# Altium PCB Zotino-DIOT.PCBDOC (part 9 of 11)
Units mil, origin at the board's own origin, x right, y up, seen from the top; angles counter-clockwise.
Board outline 8771.61 x 3949.04 mil, 4 copper layers (TopLayer, Internal Plane 2, Signal Layer 1, BottomLayer), stack 61.54 mil thick; 915 components, 534 nets, 3073 pads, 1180 vias.
Unrouted connection lines stored in the file: 36.
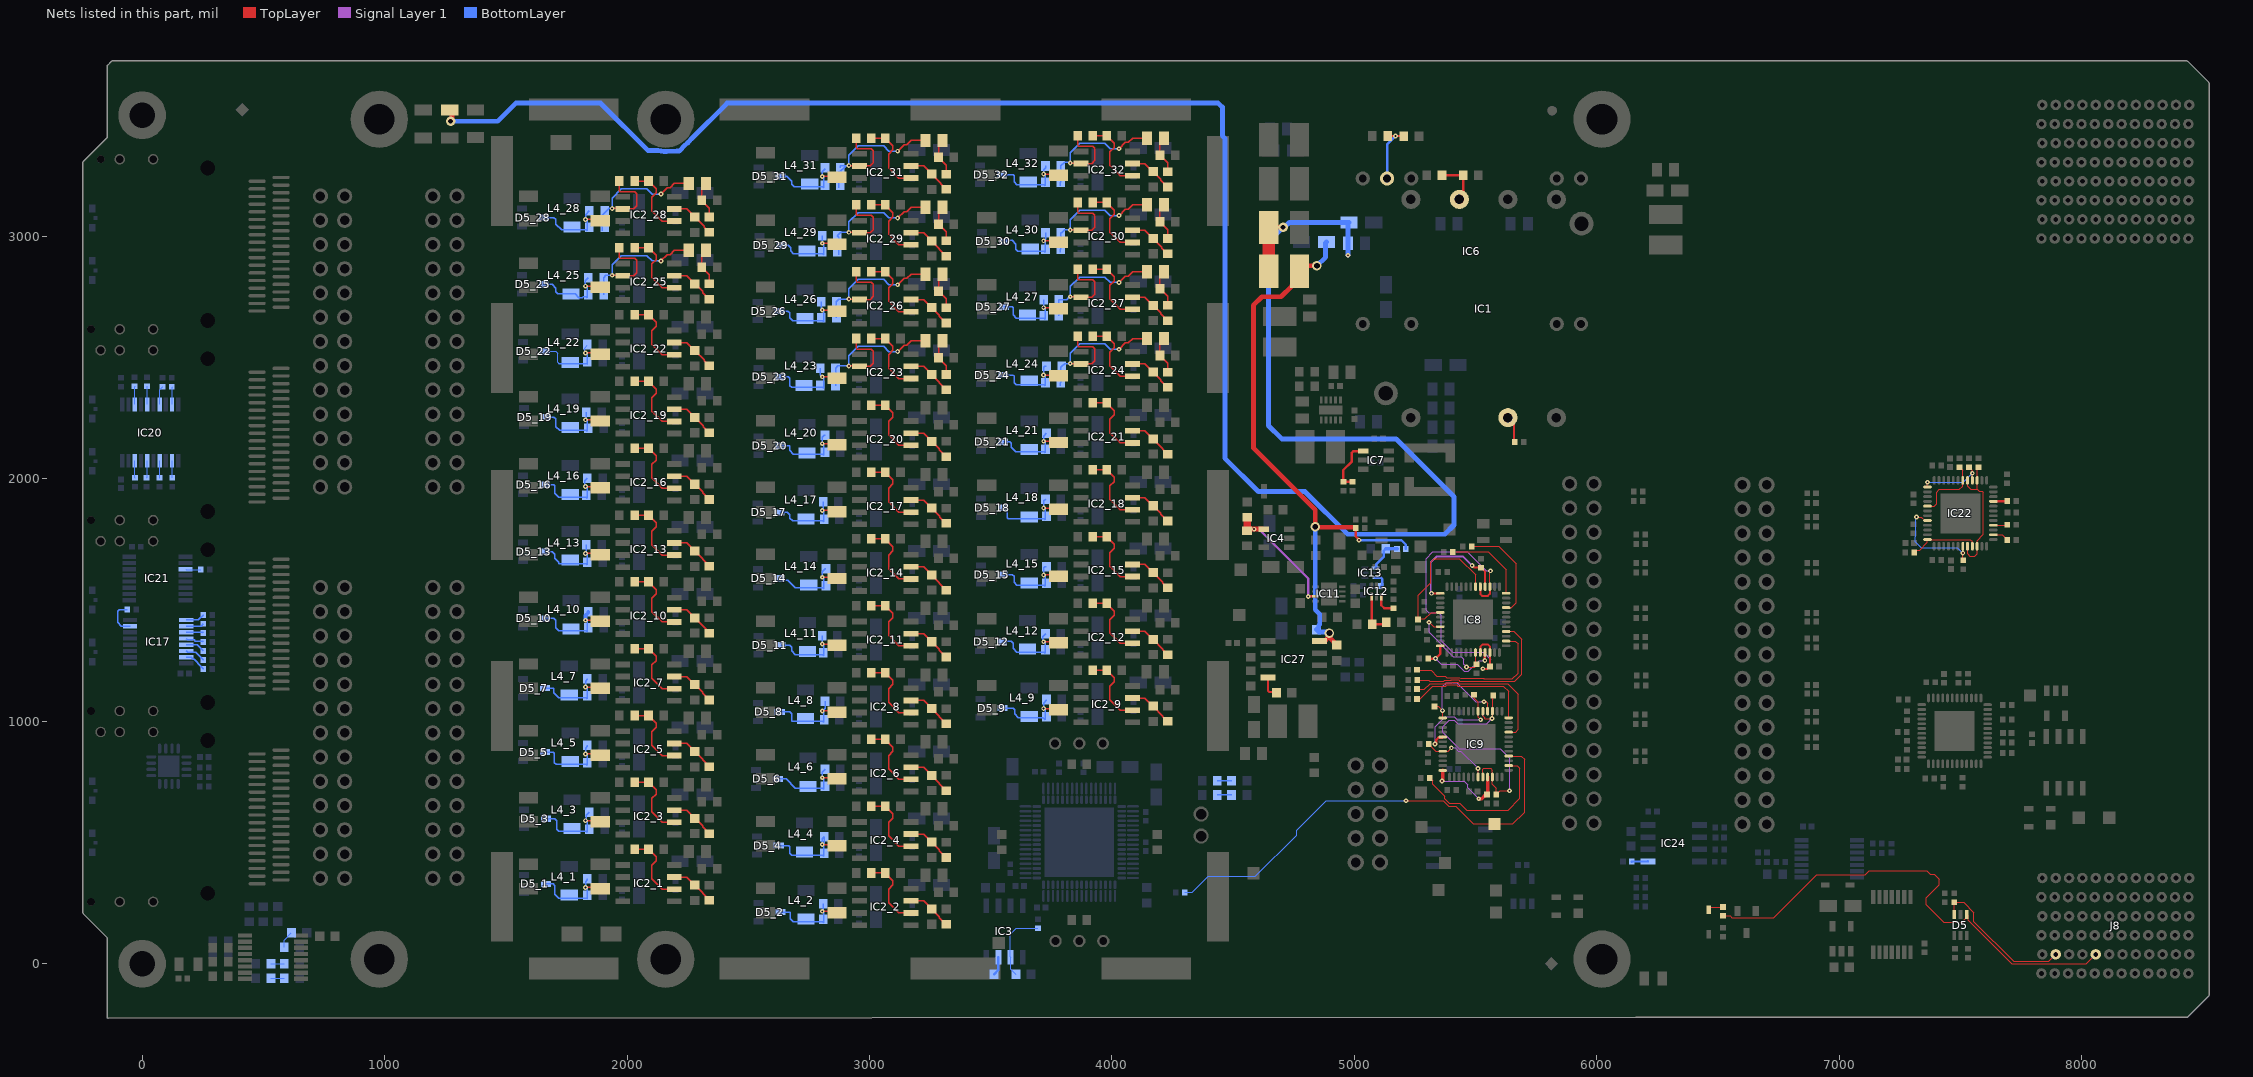
[diagram p10: the nets of this part, all layers, seen from the top]

## Via types
v1: diameter 19.68, hole 7.87, TopLayer to BottomLayer, tented both sides, 1050 vias
v2: diameter 23.62, hole 11.81, TopLayer to BottomLayer, tented both sides, 56 vias
v3: diameter 23.62, hole 11.81, TopLayer to BottomLayer, 28 vias
v4: diameter 39.37, hole 23.62, TopLayer to BottomLayer, tented both sides, 28 vias
v5: diameter 39.37, hole 19.68, TopLayer to BottomLayer, tented both sides, 7 vias
v6: diameter 19.68, hole 7.87, TopLayer to BottomLayer, tented bottom, 7 vias
v7: diameter 19.68, hole 7.87, TopLayer to BottomLayer, 4 vias

## Nets (pads, with @x,y where several pads share a name; then routed paths per layer and width w, separated by ;. In a path a pad name is that pad's centre, name@x,y a point inside that pad or via, vN(x,y) a via of type N, cw(c..) or ccw(c..) an arc to the next point about the centre after c; other vN are vias at no path point) (continued)
NetC56_23_1: C56_23.1 R24_23.2 R25_23.1 | length 158.6
  TopLayer w6: C56_23.1@3301.81,2569.3 3284.88,2552.37 R24_23.2@3284.88,2499.3 3316.38,2467.8 R25_23.1@3316.38,2430.8
NetC56_23_2: C56_23.2 IC2_23.6 R5_23.1 R7_23.1 R67_23.2 | length 807
  TopLayer w6: v1(2914.94,2466.1) 2956.88,2466.1 IC2_23.6@2958.68,2464.3 3003.79,2464.3 3016.57,2477.09 3016.57,2527.37 3008,2535.94 2948,2535.94 2944.88,2539.06 R67_23.2@2944.88,2579.3 ; v1(3116.38,2525.32) 3142.67,2551.61 3153.93,2551.61 3171.61,2569.3 C56_23.2@3230.94,2569.3
  BottomLayer w6: R7_23.1@2860,2385.36 R5_23.1@2860,2456.23 2869.88,2466.1 v1(2914.94,2466.1) 2914.94,2509.12 2953.39,2547.57 3058,2547.57 3080.25,2525.32 v1(3116.38,2525.32)
NetC56_24_1: C56_24.1 R24_24.2 R25_24.1 | length 158.6
  TopLayer w6: C56_24.1@4215.2,2579.14 4198.27,2562.21 R24_24.2@4198.27,2509.14 4229.76,2477.64 R25_24.1@4229.76,2440.64
NetC56_24_2: C56_24.2 IC2_24.6 R5_24.1 R7_24.1 R67_24.2 | length 799.4
  TopLayer w6: v1(3828.33,2475.95) 3870.26,2475.95 IC2_24.6@3872.07,2474.14 3917.17,2474.14 3929.96,2486.93 3929.96,2537.21 3921.39,2545.79 3861.39,2545.79 3858.27,2548.91 R67_24.2@3858.27,2589.14 ; v1(4029.76,2535.16) 4056.06,2561.46 4067.31,2561.46 4085,2579.14 C56_24.2@4144.33,2579.14
  BottomLayer w6: R7_24.1@3787.66,2383.64 R7_24.1@3787.66,2397.17 ; R7_24.1@3789.13,2397.17 3789.13,2460.17 R5_24.1@3793.07,2464.1 3804.91,2475.95 v1(3828.33,2475.95) 3828.33,2518.97 3866.77,2557.41 3971.39,2557.41 3993.63,2535.16 v1(4029.76,2535.16)
NetC56_25_1: C56_25.1 R24_25.2 R25_25.1 | length 158.6
  TopLayer w6: C56_25.1@2325.43,2943.31 2308.5,2926.39 R24_25.2@2308.5,2873.32 2340,2841.82 R25_25.1@2340,2804.81
NetC56_25_2: C56_25.2 IC2_25.6 R5_25.1 R7_25.1 R67_25.2 | length 787.3
  TopLayer w6: v1(1938.56,2840.12) 1980.5,2840.12 IC2_25.6@1982.31,2838.32 2027.41,2838.32 2040.2,2851.1 2040.2,2901.39 2031.62,2909.96 1971.62,2909.96 1968.5,2913.08 R67_25.2@1968.5,2953.32 ; v1(2140,2899.33) 2166.3,2925.63 2177.55,2925.63 2195.23,2943.32 C56_25.2@2254.57,2943.31
  BottomLayer w6: R7_25.1@1903.31,2759.38 R5_25.1@1903.31,2830.24 1913.18,2840.12 v1(1938.56,2840.12) 1938.56,2883.14 1977.01,2921.58 2081.62,2921.58 2103.87,2899.33 v1(2140,2899.33)
NetC56_26_1: C56_26.1 R24_26.2 R25_26.1 | length 158.6
  TopLayer w6: C56_26.1@3301.81,2844.89 3284.88,2827.96 R24_26.2@3284.88,2774.89 3316.38,2743.39 R25_26.1@3316.38,2706.39
NetC56_26_2: C56_26.2 IC2_26.6 R5_26.1 R7_26.1 R67_26.2 | length 799.1
  TopLayer w6: v1(2914.94,2741.69) 2956.88,2741.69 IC2_26.6@2958.68,2739.89 3003.79,2739.89 3016.57,2752.68 3016.57,2802.96 3008,2811.53 2948,2811.53 2944.88,2814.65 R67_26.2@2944.88,2854.89 ; v1(3116.38,2800.91) 3142.67,2827.2 3153.93,2827.2 3171.61,2844.89 C56_26.2@3230.94,2844.89
  BottomLayer w6: R7_26.1@2863.94,2664.89 R5_26.1@2863.94,2731.82 2873.81,2741.69 v1(2914.94,2741.69) 2914.94,2784.71 2953.39,2823.16 3058,2823.16 3080.25,2800.91 v1(3116.38,2800.91)
NetC56_27_1: C56_27.1 R24_27.2 R25_27.1 | length 158.6
  TopLayer w6: C56_27.1@4215.2,2854.73 4198.27,2837.8 R24_27.2@4198.27,2784.73 4229.76,2753.24 R25_27.1@4229.76,2716.23
NetC56_27_2: C56_27.2 IC2_27.6 R5_27.1 R7_27.1 R67_27.2 | length 796
  TopLayer w6: v1(3828.33,2751.54) 3870.26,2751.54 IC2_27.6@3872.07,2749.73 3917.17,2749.73 3929.96,2762.52 3929.96,2812.8 3921.39,2821.38 3861.39,2821.38 3858.27,2824.5 R67_27.2@3858.27,2864.73 ; v1(4029.76,2810.75) 4056.06,2837.05 4067.31,2837.05 4085,2854.73 C56_27.2@4144.33,2854.73
  BottomLayer w6: R7_27.1@3781.26,2672.76 R5_27.1@3781.26,2739.69 3812.76,2739.69 3824.6,2751.54 v1(3828.33,2751.54) 3828.33,2794.56 3866.77,2833 3971.39,2833 3993.63,2810.75 v1(4029.76,2810.75)
NetC56_28_1: C56_28.1 R24_28.2 R25_28.1 | length 158.6
  TopLayer w6: C56_28.1@2325.43,3218.9 2308.5,3201.98 R24_28.2@2308.5,3148.91 2340,3117.41 R25_28.1@2340,3080.4
NetC56_28_2: C56_28.2 IC2_28.6 R5_28.1 R7_28.1 R67_28.2 | length 793.2
  TopLayer w6: v1(1938.56,3115.71) 1980.5,3115.71 IC2_28.6@1982.31,3113.91 2027.41,3113.91 2040.2,3126.69 2040.2,3176.98 2031.62,3185.55 1971.62,3185.55 1968.5,3188.67 R67_28.2@1968.5,3228.91 ; v1(2140,3174.92) 2166.3,3201.22 2177.55,3201.22 2195.23,3218.91 C56_28.2@2254.57,3218.9
  BottomLayer w6: R7_28.1@1897.9,3023.4 1897.9,3086.8 1926.81,3115.71 v1(1938.56,3115.71) 1938.56,3158.73 1977.01,3197.17 2081.62,3197.17 2103.87,3174.92 v1(2140,3174.92)
NetC56_29_1: C56_29.1 R24_29.2 R25_29.1 | length 158.6
  TopLayer w6: C56_29.1@3301.81,3120.48 3284.88,3103.55 R24_29.2@3284.88,3050.48 3316.38,3018.98 R25_29.1@3316.38,2981.98
NetC56_29_2: C56_29.2 IC2_29.6 R5_29.1 R7_29.1 R67_29.2 | length 811
  TopLayer w6: v1(2914.94,3017.29) 2956.88,3017.29 IC2_29.6@2958.68,3015.48 3003.79,3015.48 3016.57,3028.27 3016.57,3078.55 3008,3087.13 2948,3087.13 2944.88,3090.24 R67_29.2@2944.88,3130.48 ; v1(3116.38,3076.5) 3142.67,3102.8 3153.93,3102.8 3171.61,3120.48 C56_29.2@3230.94,3120.48
  BottomLayer w6: R7_29.1@2874.27,2924.98 2874.27,2997.07 R5_29.1@2867.87,3003.47 2881.69,3017.29 v1(2914.94,3017.29) 2914.94,3060.3 2953.39,3098.75 3058,3098.75 3080.25,3076.5 v1(3116.38,3076.5)
NetC56_30_1: C56_30.1 R24_30.2 R25_30.1 | length 158.6
  TopLayer w6: C56_30.1@4215.2,3130.32 4198.27,3113.39 R24_30.2@4198.27,3060.32 4229.76,3028.83 R25_30.1@4229.76,2991.82
NetC56_30_2: C56_30.2 IC2_30.6 R5_30.1 R7_30.1 R67_30.2 | length 801.7
  TopLayer w6: v1(3828.33,3027.13) 3870.26,3027.13 IC2_30.6@3872.07,3025.32 3917.17,3025.32 3929.96,3038.11 3929.96,3088.39 3921.39,3096.97 3861.39,3096.97 3858.27,3100.09 R67_30.2@3858.27,3140.32 ; v1(4029.76,3086.34) 4056.06,3112.64 4067.31,3112.64 4085,3130.32 C56_30.2@4144.33,3130.32
  BottomLayer w6: R7_30.1@3787.66,2934.82 R7_30.1@3787.66,2948.35 ; R7_30.1@3789.13,2948.35 R5_30.1@3789.13,3015.28 3793.07,3015.28 3804.91,3027.13 v1(3828.33,3027.13) 3828.33,3070.15 3866.77,3108.59 3971.39,3108.59 3993.63,3086.34 v1(4029.76,3086.34)
NetC56_31_1: C56_31.1 R24_31.2 R25_31.1 | length 158.6
  TopLayer w6: C56_31.1@3301.81,3396.07 3284.88,3379.14 R24_31.2@3284.88,3326.07 3316.38,3294.57 R25_31.1@3316.38,3257.57
NetC56_31_2: C56_31.2 IC2_31.6 R5_31.1 R7_31.1 R67_31.2 | length 825.4
  TopLayer w6: v1(2914.94,3292.88) 2956.88,3292.88 IC2_31.6@2958.68,3291.07 3003.79,3291.07 3016.57,3303.86 3016.57,3354.14 3008,3362.72 2948,3362.72 2944.88,3365.83 R67_31.2@2944.88,3406.07 ; v1(3116.38,3352.09) 3142.67,3378.39 3153.93,3378.39 3171.61,3396.07 C56_31.2@3230.94,3396.07
  BottomLayer w6: R7_31.1@2874.27,3200.57 2874.27,3263.97 2903.18,3292.88 ; R5_31.1@2879.69,3283 2879.69,3290.87 2881.69,3292.88 2903.18,3292.88 ; v1(3116.38,3352.09) 3080.25,3352.09 3058,3374.34 2953.39,3374.34 2914.94,3335.9 v1(2914.94,3292.88) 2903.18,3292.88
NetC56_32_1: C56_32.1 R24_32.2 R25_32.1 | length 158.6
  TopLayer w6: C56_32.1@4215.2,3405.91 4198.27,3388.98 R24_32.2@4198.27,3335.91 4229.76,3304.42 R25_32.1@4229.76,3267.41
NetC56_32_2: C56_32.2 IC2_32.6 R5_32.1 R7_32.1 R67_32.2 | length 801.2
  TopLayer w6: v1(3828.33,3302.72) 3870.26,3302.72 IC2_32.6@3872.07,3300.91 3917.17,3300.91 3929.96,3313.7 3929.96,3363.98 3921.39,3372.56 3861.39,3372.56 3858.27,3375.68 R67_32.2@3858.27,3415.91 ; v1(4029.76,3361.93) 4056.06,3388.23 4067.31,3388.23 4085,3405.91 C56_32.2@4144.33,3405.91
  BottomLayer w6: R7_32.1@3787.66,3210.41 R7_32.1@3787.66,3223.94 ; R7_32.1@3789.13,3223.94 R5_32.1@3789.13,3290.87 3804.88,3306.62 3820.7,3306.62 v1@3824.6,3302.72 ; v1(3828.33,3302.72) 3828.33,3345.74 3866.77,3384.18 3971.39,3384.18 3993.63,3361.93 v1(4029.76,3361.93)
NetC61_1_2: C61_1.2 IC2_1.3 R25_1.2 | length 186.8
  TopLayer w6: IC2_1.3@2194.9,358 2246.5,358 C61_1.2@2280,324.5 2311.5,293 2311.5,290.01 R25_1.2@2340,261.5
NetC61_2_2: C61_2.2 IC2_2.3 R25_2.2 | length 187.9
  TopLayer w6: IC2_2.3@3171.28,259.57 3222.87,259.57 3287.87,194.57 3287.87,189.77 3314.57,163.08 R25_2.2@3316.38,163.08
NetC61_3_2: C61_3.2 IC2_3.3 R25_3.2 | length 186.8
  TopLayer w6: IC2_3.3@2194.9,633.59 2246.5,633.59 2311.5,568.59 2311.5,565.6 R25_3.2@2340,537.09
NetC61_4_2: C61_4.2 IC2_4.3 R25_4.2 | length 186.8
  TopLayer w6: IC2_4.3@3171.28,535.17 3222.87,535.17 3287.87,470.17 3287.87,467.17 R25_4.2@3316.38,438.67
NetC61_5_2: C61_5.2 IC2_5.3 R25_5.2 | length 186.8
  TopLayer w6: IC2_5.3@2194.9,909.18 2246.5,909.18 C61_5.2@2280,875.68 2311.5,844.18 2311.5,841.19 R25_5.2@2340,812.68
NetC61_6_2: C61_6.2 IC2_6.3 R25_6.2 | length 186.8
  TopLayer w6: IC2_6.3@3171.28,810.76 3222.87,810.76 3287.87,745.76 3287.87,742.76 R25_6.2@3316.38,714.26
NetC61_7_2: C61_7.2 IC2_7.3 R25_7.2 | length 186.8
  TopLayer w6: IC2_7.3@2194.9,1184.77 2246.5,1184.77 2311.5,1119.77 2311.5,1116.78 R25_7.2@2340,1088.27
NetC61_8_2: C61_8.2 IC2_8.3 R25_8.2 | length 186.8
  TopLayer w6: IC2_8.3@3171.28,1086.35 3222.87,1086.35 C61_8.2@3256.38,1052.84 3287.87,1021.35 3287.87,1018.35 R25_8.2@3316.38,989.85
NetC61_9_2: C61_9.2 IC2_9.3 R25_9.2 | length 186.8
  TopLayer w6: IC2_9.3@4084.67,1096.19 4136.26,1096.19 C61_9.2@4169.76,1062.69 4210.39,1022.06 4210.39,1019.06 R25_9.2@4229.76,999.69
NetC61_10_2: C61_10.2 IC2_10.3 R25_10.2 | length 186.8
  TopLayer w6: IC2_10.3@2194.9,1460.36 2246.5,1460.36 2340,1366.86 R25_10.2@2340,1363.87
NetC61_11_2: C61_11.2 IC2_11.3 R25_11.2 | length 186.8
  TopLayer w6: IC2_11.3@3171.28,1361.94 3222.87,1361.94 3287.87,1296.94 3287.87,1293.94 R25_11.2@3316.38,1265.44
NetC61_12_2: C61_12.2 IC2_12.3 R25_12.2 | length 186.8
  TopLayer w6: IC2_12.3@4084.67,1371.78 4136.26,1371.78 C61_12.2@4169.76,1338.28 4210.24,1297.8 4210.24,1294.81 R25_12.2@4229.76,1275.28
NetC61_13_2: C61_13.2 IC2_13.3 R25_13.2 | length 186.8
  TopLayer w6: IC2_13.3@2194.9,1735.95 2246.5,1735.95 C61_13.2@2280,1702.45 2311.5,1670.95 2311.5,1667.96 R25_13.2@2340,1639.46
NetC61_14_2: C61_14.2 IC2_14.3 R25_14.2 | length 186.8
  TopLayer w6: IC2_14.3@3171.28,1637.53 3222.87,1637.53 3287.87,1572.53 3287.87,1569.53 R25_14.2@3316.38,1541.03
NetC61_15_2: C61_15.2 IC2_15.3 R25_15.2 | length 186.8
  TopLayer w6: IC2_15.3@4084.67,1647.37 4136.26,1647.37 C61_15.2@4169.76,1613.87 4210.24,1573.39 4210.24,1570.4 R25_15.2@4229.76,1550.87
NetC61_16_2: C61_16.2 IC2_16.3 R25_16.2 | length 186.8
  TopLayer w6: IC2_16.3@2194.9,2011.54 2246.5,2011.54 C61_16.2@2280,1978.04 2311.5,1946.54 2311.5,1943.55 R25_16.2@2340,1915.05
NetC61_17_2: C61_17.2 IC2_17.3 R25_17.2 | length 187.9
  TopLayer w6: IC2_17.3@3171.28,1913.12 3222.87,1913.12 C61_17.2@3256.38,1879.61 3290,1845.99 3290,1841.19 3314.57,1816.62 R25_17.2@3316.38,1816.62
NetC61_18_2: C61_18.2 IC2_18.3 R25_18.2 | length 186.8
  TopLayer w6: IC2_18.3@4084.67,1922.96 4136.26,1922.96 4201.26,1857.96 4201.26,1854.97 R25_18.2@4229.76,1826.46
NetC61_19_2: C61_19.2 IC2_19.3 R25_19.2 | length 187.9
  TopLayer w6: IC2_19.3@2194.9,2287.13 2246.5,2287.13 2313.62,2220.01 2313.62,2215.2 2338.19,2190.64 R25_19.2@2340,2190.64
NetC61_20_2: C61_20.2 IC2_20.3 R25_20.2 | length 186.8
  TopLayer w6: IC2_20.3@3171.28,2188.71 3222.87,2188.71 3287.87,2123.71 3287.87,2120.72 R25_20.2@3316.38,2092.21
NetC61_21_2: C61_21.2 IC2_21.3 R25_21.2 | length 186.8
  TopLayer w6: IC2_21.3@4084.67,2198.55 4136.26,2198.55 4210.24,2124.57 4210.24,2121.58 R25_21.2@4229.76,2102.06
NetC61_22_2: C61_22.2 IC2_22.3 R25_22.2 | length 186.8
  TopLayer w6: IC2_22.3@2194.9,2562.72 2246.5,2562.72 C61_22.2@2280,2529.22 2318.5,2490.72 2318.5,2487.72 R25_22.2@2340,2466.23
NetC61_23_2: C61_23.2 IC2_23.3 R25_23.2 | length 186.8
  TopLayer w6: IC2_23.3@3171.28,2464.3 3222.87,2464.3 3287.87,2399.3 3287.87,2396.31 R25_23.2@3316.38,2367.8
NetC61_24_2: C61_24.2 IC2_24.3 R25_24.2 | length 187.5
  TopLayer w6: IC2_24.3@4084.67,2474.14 4136.26,2474.14 4201.26,2409.14 4201.26,2405.05 4202.36,2405.05 R25_24.2@4229.76,2377.65
NetC61_25_2: C61_25.2 IC2_25.3 R25_25.2 | length 187.9
  TopLayer w6: IC2_25.3@2194.9,2838.32 2246.5,2838.32 2311.5,2773.32 2311.5,2768.51 2338.19,2741.82 R25_25.2@2340,2741.82
NetC61_26_2: C61_26.2 IC2_26.3 R25_26.2 | length 186.8
  TopLayer w6: IC2_26.3@3171.28,2739.89 3222.87,2739.89 3287.87,2674.89 3287.87,2671.9 R25_26.2@3316.38,2643.39
NetC61_27_2: C61_27.2 IC2_27.3 R25_27.2 | length 186.8
  TopLayer w6: IC2_27.3@4084.67,2749.73 4136.26,2749.73 4201.26,2684.73 4201.26,2681.74 R25_27.2@4229.76,2653.24
NetC61_28_2: C61_28.2 IC2_28.3 R25_28.2 | length 186.8
  TopLayer w6: IC2_28.3@2194.9,3113.91 2246.5,3113.91 2318.5,3041.9 2318.5,3038.91 R25_28.2@2340,3017.41
NetC61_29_2: C61_29.2 IC2_29.3 R25_29.2 | length 186.8
  TopLayer w6: IC2_29.3@3171.28,3015.48 3222.87,3015.48 3287.87,2950.48 3287.87,2947.49 R25_29.2@3316.38,2918.98
NetC61_30_2: C61_30.2 IC2_30.3 R25_30.2 | length 186.8
  TopLayer w6: IC2_30.3@4084.67,3025.32 4136.26,3025.32 4206.3,2955.28 4206.3,2952.29 R25_30.2@4229.76,2928.83
NetC61_31_2: C61_31.2 IC2_31.3 R25_31.2 | length 186.8
  TopLayer w6: IC2_31.3@3171.28,3291.07 3222.87,3291.07 3293.5,3220.44 3293.5,3217.45 R25_31.2@3316.38,3194.58
NetC61_32_2: C61_32.2 IC2_32.3 R25_32.2 | length 187.5
  TopLayer w6: IC2_32.3@4084.67,3300.91 4136.26,3300.91 4201.26,3235.91 4201.26,3231.82 4202.36,3231.82 R25_32.2@4229.76,3204.42
NetC62_1_2: C62_1.2 D5_1.3 L4_1.1 R5_1.2 R7_1.2 | length 367.2
  TopLayer w6: v1(1828.71,314.8) 1884.35,314.8 L4_1.1@1889.35,309.81
  BottomLayer w6: D5_1.3@1665.12,329.51 1665.67,330.06 1694.83,330.06 1702.52,322.37 1702.52,287.6 1718.68,271.43 1830.97,271.43 1834.9,267.5 1834.9,308.62 v1(1828.71,314.8) 1828.71,338.33 1836.38,345.99 R7_1.2@1836.38,349.93
NetC62_2_2: C62_2.2 D5_2.3 L4_2.1 R5_2.2 R7_2.2 | length 357.5
  TopLayer w6: v1(2805.09,216.38) 2860.73,216.38 L4_2.1@2865.73,211.38
  BottomLayer w6: D5_2.3@2633.62,213.35 2673.75,213.35 2673.75,185.79 2686.46,173.08 2694.99,173.08 2695.06,173.01 2807.34,173.01 2811.28,169.07 2811.28,210.19 v1(2805.09,216.38) 2808.82,220.1 R7_2.2@2808.82,247.57
NetC62_3_2: C62_3.2 D5_3.3 L4_3.1 R5_3.2 R7_3.2 | length 367
  TopLayer w6: v1(1828.71,590.39) 1884.35,590.39 L4_3.1@1889.35,585.4
  BottomLayer w6: D5_3.3@1665.12,597.96 1702.52,597.96 1710.39,590.09 1710.39,555.31 1718.68,547.02 1830.97,547.02 1834.9,543.09 1834.9,584.21 v1(1828.71,590.39) 1832.44,594.12 1832.44,613.71 R5_3.2@1844.25,625.52
NetC62_4_2: C62_4.2 D5_4.3 L4_4.1 R5_4.2 R7_4.2 | length 400.8
  TopLayer w6: v1(2805.09,491.97) 2860.73,491.97 L4_4.1@2865.73,486.97
  BottomLayer w6: D5_4.3@2625.75,487.72 2667.09,487.72 2671.02,483.79 2671.02,456.23 2678.59,448.67 2694.99,448.67 2695.06,448.6 2807.34,448.6 2811.28,444.66 2811.28,485.78 v1(2805.09,491.97) ; v1(2805.09,491.97) 2805.09,515.49 R5_4.2@2812.76,523.16 2812.76,499.63 v1(2805.09,491.97)
NetC62_5_2: C62_5.2 D5_5.3 L4_5.1 R5_5.2 R7_5.2 | length 369.6
  TopLayer w6: v1(1828.71,865.98) 1884.35,865.98 L4_5.1@1889.35,860.99
  BottomLayer w6: D5_5.3@1661.18,873.55 1694.65,873.55 1700,868.2 1700,830.24 1707.56,822.68 1726.07,822.68 1726.14,822.61 1830.97,822.61 1834.9,818.68 1834.9,859.8 v1(1828.71,865.98) 1828.71,889.51 1836.38,897.17 R5_5.2@1836.38,901.11
NetC62_6_2: C62_6.2 D5_6.3 L4_6.1 R5_6.2 R7_6.2 | length 359.1
  TopLayer w6: v1(2805.09,767.56) 2860.73,767.56 L4_6.1@2865.73,762.56
  BottomLayer w6: D5_6.3@2622.43,762.56 2656.03,762.56 2694.4,724.19 2807.34,724.19 2811.28,720.25 2811.28,761.37 v1(2805.09,767.56) 2804.88,767.77 2804.88,790.87 R5_6.2@2816.69,802.69
NetC62_7_2: C62_7.2 D5_7.3 L4_7.1 R5_7.2 R7_7.2 | length 354
  TopLayer w6: v1(1828.71,1141.58) 1884.35,1141.58 L4_7.1@1889.35,1136.58
  BottomLayer w6: D5_7.3@1661.18,1137.33 1698.58,1137.33 1698.58,1117.65 1717.96,1098.27 1718.62,1098.27 1718.68,1098.21 1830.97,1098.21 1834.9,1094.27 1834.9,1135.39 v1(1828.71,1141.58) 1828.71,1165.1 1836.38,1172.76 R5_7.2@1836.38,1176.7
NetC62_8_2: C62_8.2 D5_8.3 L4_8.1 R5_8.2 R7_8.2 | length 373.9
  TopLayer w6: v1(2805.09,1043.15) 2860.73,1043.15 L4_8.1@2865.73,1038.15
  BottomLayer w6: D5_8.3@2629.88,1038.91 2671.02,1038.91 2678.9,1031.03 2678.9,999.85 2694.99,999.85 2695.06,999.78 2807.34,999.78 2811.28,995.84 2811.28,1036.96 v1(2805.09,1043.15) 2816.69,1054.75 R5_8.2@2816.69,1082.21
NetC62_9_2: C62_9.2 D5_9.3 L4_9.1 R5_9.2 R7_9.2 | length 360.3
  TopLayer w6: v1(3718.48,1052.99) 3774.12,1052.99 L4_9.1@3779.12,1047.99
  BottomLayer w6: D5_9.3@3549.17,1054.65 3592.28,1054.65 3598.84,1048.1 3598.84,1031.03 3614.03,1015.84 3714.51,1015.84 3724.67,1005.69 3724.67,1046.8 v1(3718.48,1052.99) 3718.48,1074.55 3730.08,1086.15 R5_9.2@3730.08,1090.15
NetC62_10_2: C62_10.2 D5_10.3 L4_10.1 R5_10.2 R7_10.2 | length 367.4
  TopLayer w6: v1(1828.71,1417.17) 1884.35,1417.17 L4_10.1@1889.35,1412.17
  BottomLayer w6: D5_10.3@1661.18,1424.73 1698.58,1424.73 1706.46,1416.86 1706.46,1385.36 1717.96,1373.86 1718.62,1373.86 1718.68,1373.8 1830.97,1373.8 1834.9,1369.86 1834.9,1410.98 v1(1828.71,1417.17)
  BottomLayer w15: v1(1828.71,1417.17) 1828.71,1436.75 1840.31,1448.35 R5_10.2@1840.31,1452.29
NetC62_11_2: C62_11.2 D5_11.3 L4_11.1 R5_11.2 R7_11.2 | length 352.5
  TopLayer w6: v1(2805.09,1318.74) 2860.73,1318.74 L4_11.1@2865.73,1313.74
  BottomLayer w6: D5_11.3@2633.62,1314.5 2671.02,1314.5 2678.9,1306.62 2678.9,1290.87 2694.33,1275.44 2694.99,1275.44 2695.06,1275.37 2807.34,1275.37 2811.28,1271.43 2811.28,1312.55 v1(2805.09,1318.74) 2804.88,1318.95 R5_11.2@2804.88,1353.87
NetC62_12_2: C62_12.2 D5_12.3 L4_12.1 R5_12.2 R7_12.2 | length 360.4
  TopLayer w6: v1(3718.48,1328.58) 3774.12,1328.58 L4_12.1@3779.12,1323.58
  BottomLayer w6: D5_12.3@3549.17,1330.24 3584.41,1330.24 3592.28,1322.37 3592.28,1301.38 3608.45,1285.21 3720.73,1285.21 3724.67,1281.28 3724.67,1322.39 v1(3718.48,1328.58) 3714.33,1332.73 3714.33,1349.93 R5_12.2@3726.14,1361.74
NetC62_13_2: C62_13.2 D5_13.3 L4_13.1 R5_13.2 R7_13.2 | length 359.3
  TopLayer w6: v1(1828.71,1692.76) 1884.35,1692.76 L4_13.1@1889.35,1687.76
  BottomLayer w6: D5_13.3@1661.18,1700.32 1690.9,1700.32 1702.52,1688.7 1702.52,1672.76 1718.62,1656.67 1718.62,1649.45 1718.68,1649.39 1830.97,1649.39 1834.9,1645.45 1834.9,1686.57 v1(1828.71,1692.76) 1832.44,1696.48 R5_13.2@1832.44,1727.88
NetC62_14_2: C62_14.2 D5_14.3 L4_14.1 R5_14.2 R7_14.2 | length 355.7
  TopLayer w6: v1(2805.09,1594.33) 2860.73,1594.33 L4_14.1@2865.73,1589.33
  BottomLayer w6: D5_14.3@2629.88,1590.09 2637.51,1582.46 2662.91,1582.46 2694.4,1550.96 2807.34,1550.96 2811.28,1547.02 2811.28,1588.14 v1(2805.09,1594.33) 2805.09,1617.86 2816.69,1629.46 R5_14.2@2820.63,1629.46
NetC62_15_2: C62_15.2 D5_15.3 L4_15.1 R5_15.2 R7_15.2 | length 364.5
  TopLayer w6: v1(3718.48,1604.17) 3774.12,1604.17 L4_15.1@3779.12,1599.17
  BottomLayer w6: D5_15.3@3550.21,1605.83 3588.35,1605.83 3596.22,1597.96 3596.22,1573.03 3608.45,1560.8 3720.73,1560.8 3724.67,1556.87 3724.67,1597.98 v1(3718.48,1604.17) 3718.48,1633.6 3722.2,1637.33 R5_15.2@3730.08,1637.33
NetC62_16_2: C62_16.2 D5_16.3 L4_16.1 R5_16.2 R7_16.2 | length 369.2
  TopLayer w6: v1(1828.71,1968.35) 1884.35,1968.35 L4_16.1@1889.35,1963.35
  BottomLayer w6: D5_16.3@1661.18,1975.91 1698.58,1975.91 1702.52,1971.98 1702.52,1940.48 1717.96,1925.04 1722.14,1925.04 1722.2,1924.98 1830.97,1924.98 1834.9,1921.04 1834.9,1962.16 v1(1828.71,1968.35) 1824.57,1972.49 1824.57,1991.66 R5_16.2@1836.38,2003.47
NetC62_17_2: C62_17.2 D5_17.3 L4_17.1 R5_17.2 R7_17.2 | length 355.1
  TopLayer w6: v1(2805.09,1869.92) 2860.73,1869.92 L4_17.1@2865.73,1864.92
  BottomLayer w6: D5_17.3@2629.69,1861.74 2661.18,1861.74 2671.02,1851.9 2671.02,1838.12 2682.52,1826.62 2694.99,1826.62 2695.06,1826.55 2807.34,1826.55 2811.28,1822.62 2811.28,1863.73 v1(2805.09,1869.92) 2808.82,1873.65 R5_17.2@2808.82,1905.05
NetC62_18_2: C62_18.2 D5_18.3 L4_18.1 R5_18.2 R7_18.2 | length 339.3
  TopLayer w6: v1(3718.48,1879.76) 3774.12,1879.76 L4_18.1@3779.12,1874.77
  BottomLayer w6: 3569.16,1867.89 3569.16,1840.09 3572.78,1836.46 3608.38,1836.46 3608.45,1836.39 3720.73,1836.39 3724.67,1832.46 3724.67,1873.58 v1(3718.48,1879.76) 3718.48,1909.19 R7_18.2@3726.14,1916.86
NetC62_19_2: C62_19.2 D5_19.3 L4_19.1 R5_19.2 R7_19.2 | length 357.8
  TopLayer w6: v1(1828.71,2243.94) 1884.35,2243.94 L4_19.1@1889.35,2238.94
  BottomLayer w6: D5_19.3@1665.12,2255.44 1698.58,2255.44 1706.7,2247.32 1706.7,2216.07 1722.2,2200.57 1830.97,2200.57 1834.9,2196.63 1834.9,2237.75 v1(1828.71,2243.94) 1832.44,2247.66 R7_19.2@1832.44,2275.13
NetC62_20_2: C62_20.2 D5_20.3 L4_20.1 R5_20.2 R7_20.2 | length 360.2
  TopLayer w6: v1(2805.09,2145.51) 2860.73,2145.51 L4_20.1@2865.73,2140.51
  BottomLayer w6: D5_20.3@2633.62,2137.33 2671.02,2137.33 2671.02,2117.65 2686.46,2102.21 2694.99,2102.21 2695.06,2102.14 2807.34,2102.14 2811.28,2098.21 2811.28,2139.32 v1(2805.09,2145.51) 2805.09,2172.97 2812.76,2180.64 R5_20.2@2816.69,2180.64
NetC62_21_2: C62_21.2 D5_21.3 L4_21.1 R5_21.2 R7_21.2 | length 352.1
  TopLayer w6: v1(3718.48,2155.35) 3774.12,2155.35 L4_21.1@3779.12,2150.36
  BottomLayer w6: D5_21.3@3550.94,2153.08 3578.5,2153.08 3584.41,2147.17 3584.41,2131.74 3604.09,2112.05 3608.38,2112.05 3608.45,2111.98 3720.73,2111.98 3724.67,2108.05 3724.67,2149.17 v1(3718.48,2155.35) 3718.27,2155.56 3718.27,2176.7 R5_21.2@3730.08,2188.51
NetC62_22_2: C62_22.2 D5_22.3 L4_22.1 R5_22.2 R7_22.2 | length 369.5
  TopLayer w6: v1(1828.71,2519.53) 1884.35,2519.53 L4_22.1@1889.35,2514.53
  BottomLayer w5: D5_22.3@1661.18,2527.09 1706.46,2527.09 1714.33,2519.22 1714.33,2480.51 1718.62,2476.23 ; v1(1828.71,2519.53) 1824.57,2523.68 1824.57,2538.91 R5_22.2@1836.38,2550.72
  BottomLayer w6: 1718.62,2476.23 1718.68,2476.16 1830.97,2476.16 1834.9,2472.22 1834.9,2513.34 v1(1828.71,2519.53)
NetC62_23_2: C62_23.2 D5_23.3 L4_23.1 R5_23.2 R7_23.2 | length 365.5
  TopLayer w6: v1(2805.09,2421.1) 2860.73,2421.1 L4_23.1@2865.73,2416.1
  BottomLayer w6: D5_23.3@2633.62,2420.8 2665.12,2420.8 2671.02,2414.89 2671.02,2385.36 2678.59,2377.8 2694.99,2377.8 2695.06,2377.73 2807.34,2377.73 2811.28,2373.8 2811.28,2414.91 v1(2805.09,2421.1) 2797.01,2429.19 R5_23.2@2797.01,2456.23
NetC62_24_2: C62_24.2 D5_24.3 L4_24.1 R5_24.2 R7_24.2 | length 366.5
  TopLayer w6: v1(3718.26,2428.66) 3771.84,2428.66 3774.12,2430.94 L4_24.1@3779.12,2425.95
  BottomLayer w6: D5_24.3@3550.94,2428.67 3592.28,2428.67 3596.22,2424.73 3596.22,2397.17 3605.82,2387.57 3720.73,2387.57 3724.67,2383.64 3724.67,2424.76 3720.76,2428.66 v1(3718.26,2428.66) 3718.26,2460.16 3722.2,2464.1 R5_24.2@3730.08,2464.1
NetC62_25_2: C62_25.2 D5_25.3 L4_25.1 R5_25.2 R7_25.2 | length 364
  TopLayer w6: v1(1828.71,2795.12) 1884.35,2795.12 L4_25.1@1889.35,2790.12
  BottomLayer w6: D5_25.3@1657.24,2802.68 1690.71,2802.68 1706.46,2786.94 1706.46,2771.19 1714.33,2763.32 C62_25.2@1769.45,2763.32 1785.44,2763.32 1801.19,2747.57 1816.69,2747.57 ; 1816.69,2751.75 1830.97,2751.75 1834.9,2747.81 1834.9,2788.93 v1(1828.71,2795.12) 1828.5,2795.33 1828.5,2818.43 R5_25.2@1840.31,2830.24
NetC62_26_2: C62_26.2 D5_26.3 L4_26.1 R5_26.2 R7_26.2 | length 360.4
  TopLayer w6: v1(2805.09,2696.69) 2860.73,2696.69 L4_26.1@2865.73,2691.69
  BottomLayer w6: D5_26.3@2629.69,2692.45 2663.15,2692.45 2671.02,2684.57 2671.02,2664.89 2682.52,2653.39 2694.99,2653.39 2695.06,2653.32 2807.34,2653.32 2811.28,2649.39 2811.28,2690.5 v1(2805.09,2696.69) 2800.94,2700.84 R5_26.2@2800.94,2731.82
NetC62_27_2: C62_27.2 D5_27.3 L4_27.1 R5_27.2 R7_27.2 | length 353.8
  TopLayer w6: v1(3718.48,2706.54) 3774.12,2706.54 L4_27.1@3779.12,2701.54
  BottomLayer w6: D5_27.3@3554.88,2709.61 3588.91,2709.61 3592.28,2706.23 3592.28,2676.7 3605.75,2663.23 3608.38,2663.23 3608.45,2663.17 3720.73,2663.17 3724.67,2659.23 3724.67,2700.35 v1(3718.48,2706.54) 3718.27,2706.75 R5_27.2@3718.27,2739.69
NetC62_28_2: C62_28.2 D5_28.3 L4_28.1 R5_28.2 R7_28.2 | length 365.9
  TopLayer w6: v1(1828.71,3070.71) 1884.35,3070.71 L4_28.1@1889.35,3065.71
  BottomLayer w6: D5_28.3@1657.24,3078.28 1698.58,3078.28 1706.46,3070.4 1706.46,3050.96 1730.08,3027.34 1830.97,3027.34 1834.9,3023.4 1834.9,3064.52 v1(1828.71,3070.71) 1828.71,3090.3 R5_28.2@1844.25,3105.83
NetC62_29_2: C62_29.2 D5_29.3 L4_29.1 R5_29.2 R7_29.2 | length 341.9
  TopLayer w6: v1(2805.09,2972.28) 2860.73,2972.28 L4_29.1@2865.73,2967.28
  BottomLayer w6: D5_29.3@2637.56,2964.1 2665.12,2964.1 2674.96,2954.26 2674.96,2940.48 2686.46,2928.98 2694.99,2928.98 2695.06,2928.91 2807.34,2928.91 2811.28,2924.98 2811.28,2966.1 v1(2805.09,2972.28) 2804.88,2972.49 R5_29.2@2804.88,3003.47
NetC62_30_2: C62_30.2 D5_30.3 L4_30.1 R5_30.2 R7_30.2 | length 351.5
  TopLayer w6: v1(3718.48,2982.13) 3774.12,2982.13 L4_30.1@3779.12,2977.13
  BottomLayer w6: D5_30.3@3554.88,2983.79 3588.35,2983.79 3604.09,2968.04 3604.09,2946.63 3611.97,2938.76 3720.73,2938.76 3724.67,2934.82 3724.67,2975.94 v1(3718.48,2982.13) 3726.14,2989.79 R5_30.2@3726.14,3015.28
NetC62_31_2: C62_31.2 D5_31.3 L4_31.1 R5_31.2 R7_31.2 | length 352.4
  TopLayer w6: v1(2805.09,3247.87) 2860.73,3247.87 L4_31.1@2865.73,3242.87
  BottomLayer w6: D5_31.3@2633.82,3247.57 2659.21,3247.57 2678.9,3227.88 2678.9,3216.07 2690.4,3204.57 2694.99,3204.57 2695.06,3204.5 2807.34,3204.5 2811.28,3200.57 2811.28,3241.69 v1(2805.09,3247.87) 2805.09,3267.46 R5_31.2@2816.69,3279.06
NetC62_32_2: C62_32.2 D5_32.3 L4_32.1 R5_32.2 R7_32.2 | length 359.8
  TopLayer w6: v1(3718.48,3257.72) 3774.12,3257.72 L4_32.1@3779.12,3252.72
  BottomLayer w6: D5_32.3@3547.01,3255.44 3592.28,3255.44 3596.22,3251.5 3596.22,3226.57 3608.45,3214.35 3720.73,3214.35 3724.67,3210.41 3724.67,3251.53 v1(3718.48,3257.72) 3718.48,3275.34 3726.14,3283 R5_32.2@3726.14,3290.87
NetC63_2: C63.2 C133.2 C134.1 IC27.8 L7.2 R36.2 R38.2 | length 2546
  TopLayer w10: R36.2@5005.43,1798.27 5005.43,1763.35 5018.83,1749.95 v1(5018.83,1747.33)
  TopLayer w20: v4(4845.65,2879.29) 4773.12,2879.29 4773.12,2826.76 4743.75,2797.39 4743.47,2797.39 4697.58,2751.5 4619.09,2751.5 4583.84,2716.26 4583.84,2127.89 4838.84,1872.89 v4(4838.84,1802.89) 4841.25,1800.48 5004.02,1800.48 5005.43,1799.06 R36.2@5005.43,1798.27 ; IC27.8@4855.92,1331.11 4877.51,1331.11 v4@4892.82,1346.42 ; v4(4897.25,1364.3) 4893.55,1360.6 4893.55,1347.14 v4@4892.82,1346.42 ; C133.2@4928.26,1314.92 4896.76,1346.42 v4@4892.82,1346.42
  BottomLayer w10: v1(5018.83,1747.33) 5019.17,1746.99 5194.46,1746.99 5212.34,1729.11 5212.34,1712.25 R38.2@5212.97,1711.62
  BottomLayer w20: v4(4838.84,1802.89) 4838.84,1526.04 4839,1525.88 4839,1505.3 4838.84,1505.15 4838.84,1460.8 4857.05,1442.59 4857.05,1400.06 4853.27,1396.28 4853.27,1387.36 C63.2@4844.57,1378.66 4853.27,1369.96 4853.27,1368.98 4887.34,1368.98 4892.01,1364.3 v4(4897.25,1364.3) ; v4(4845.65,2879.29) 4881.65,2915.29 4881.65,2974.52 C134.1@4885.02,2977.89
NetC64_1: C64.1 IC27.4 | length 89.7
  TopLayer w7.87: IC27.4@4643.32,1181.11 4644.6,1179.83 4644.6,1125.53 4649.21,1120.91 C64.1@4676.23,1120.91
NetC68_2: C68.2 R117.1 | length 59.1
  BottomLayer w6: R117.1@4434.8,755.57 C68.2@4493.86,755.57
NetC71_2: C71.2 R118.1 | length 55.1
  BottomLayer w5: C71.2@531.26,-0.46 R118.1@586.38,-0.46
NetC76_2: C76.2 R82.1 | length 55.1
  BottomLayer w5: C76.2@531.26,-59.52 R82.1@586.38,-59.52
NetC77_2: C77.2 R58.1 | length 71.3
  BottomLayer w5: R58.1@586.38,68.43 586.38,97.96 C77.2@615.91,127.49
NetC80_2: C80.2 IC3.2 R3.2 | length 299.6
  BottomLayer w5: C80.2@3604.09,-43.77 3581.85,-21.53 IC3.2@3581.85,27.09 3580.47,28.47 3580.47,121.58 3605.28,146.39 R3.2@3694.65,146.39
NetC82_2: C82.2 IC3.3 | length 78.4
  BottomLayer w10: C82.2@3513.54,-43.77 3531.1,-26.21 3531.1,26.35 IC3.3@3531.85,27.09
NetC95_2: C95.2 R116.1 | length 59.1
  BottomLayer w6: R116.1@4434.8,696.39 C95.2@4493.86,696.39
NetC100_2: C100.2 IC24.5 | length 67.2
  BottomLayer w10: C100.2@6144.16,421.72 6144.46,422.02 6210.87,422.02 IC24.5@6211.17,422.31
NetC131_2: C131.2 C132.1 L6.2 L7.1 R31.1 | length 8455.6
  TopLayer w20: v5(1272.1,3475.76) 1272.1,3486.19 1277.32,3491.41 R31.1@1277.32,3521.19 ; L6.2@4647.14,3037.29 4647.83,3037.98 v5(4706.19,3037.98)
  TopLayer w50: L7.1@4647.14,2879.29 L6.2@4647.14,3037.29
  BottomLayer w20: v5(1272.1,3475.76) 1466.52,3475.76 1541.27,3550.51 1890.43,3550.51 2086.61,3354.33 2128.21,3354.33 ccw(c2159.21,3483.78) 2163.61,3350.74 2206.72,3352.15 2214.62,3352.41 2240.84,3378.64 ccw(c2159.21,3483.78) 2264.35,3402.15 2412.72,3550.51 3550.26,3550.51 3550.5,3550.75 3571.08,3550.75 3571.31,3550.51 4438.94,3550.51 4455.47,3533.98 4455.47,3415.89 4466.3,3405.06 4466.3,2086.15 4604.09,1948.35 4795.88,1948.35 4972.06,1772.17 5373.38,1772.17 5411.18,1809.97 5411.18,1925.79 5171.92,2165.05 4700.84,2165.05 4645.84,2220.05 4645.84,2977.62 v5(4706.19,3037.98) 4711.44,3037.98 4731.35,3057.89 C132.1@4977.66,3057.89 4973.41,3053.64 C131.2@4973.41,2972.89 4973.41,2923.32 v1(4973.84,2922.89)
NetD4_1: D4.1 R185.1 | length 64.9
  TopLayer w5: D4.1@6461.5,223.8 6461.5,226.96 6468.84,234.31 R185.1@6520.18,234.31
NetD5_4: D5.4 J8.H2 R185.2 | length 1980.2
  TopLayer w5: R185.2@6520.18,197.3 6550.73,197.3 6557.7,190.33 6729.7,190.33 6907.26,367.89 7107.5,367.89 7123.09,383.48 7361.51,383.48 7376.44,368.56 7392.18,368.56 7411.77,348.98 7411.77,325.15 7381.89,295.28 7380.99,295.28 7358.27,272.56 7358.27,244.09 7431.1,171.26 7510.83,171.26 7515.72,176.16 7515.72,182.03 7525.94,192.25 D5.4@7525.94,203.07 7531.31,197.7 7531.31,180.24 7711.8,-0.25 8019.22,-0.25 J8.H2@8058.38,38.91
NetD5_6: D5.6 J8.K2 R205.2 | length 603.5
  TopLayer w5: D5.6@7474.76,203.07 7474.76,252.96 R205.2@7474.53,253.18 7513.55,253.18 7555.12,211.61 7555.12,174.21 7719.58,9.75 7863.87,9.75 J8.K2@7893.02,38.91
NetIC1_2: IC1.2 R2.2 | length 110.3
  TopLayer w10: IC1.2@5633.54,2253 5658.5,2228.04 R2.2@5658.5,2153
NetIC1_6: IC1.6 R1.1 R4.2 | length 193.2
  TopLayer w10: R1.1@5361.5,3253 R4.2@5448.5,3253 5448.5,3167.96 IC1.6@5433.54,3153
NetIC2_1_2: IC2_1.2 R67_1.1 R68_1.2 | length 310.1
  TopLayer w6: R67_1.1@2031.5,473 R68_1.2@2088.5,473 2120,441.5 2120,424.25 2102.16,406.41 2102.16,350.84 2145,308 IC2_1.2@2194.9,308
NetIC2_2_2: IC2_2.2 R67_2.1 R68_2.2 | length 310.1
  TopLayer w6: R67_2.1@3007.87,374.57 R68_2.2@3064.88,374.57 3096.38,343.08 3096.38,325.83 3078.54,307.98 3078.54,252.42 3121.38,209.57 IC2_2.2@3171.28,209.57
NetIC2_3_2: IC2_3.2 R67_3.1 R68_3.2 | length 310.1
  TopLayer w6: R67_3.1@2031.5,748.59 R68_3.2@2088.5,748.59 2120,717.09 2120,699.84 2102.16,682 2102.16,626.43 2145,583.59 IC2_3.2@2194.9,583.59
NetIC2_4_2: IC2_4.2 R67_4.1 R68_4.2 | length 310.1
  TopLayer w6: R67_4.1@3007.87,650.17 R68_4.2@3064.88,650.17 3096.38,618.67 3096.38,601.42 3078.54,583.57 3078.54,528.01 3121.38,485.17 IC2_4.2@3171.28,485.17
NetIC2_5_2: IC2_5.2 R67_5.1 R68_5.2 | length 310.1
  TopLayer w6: R67_5.1@2031.5,1024.18 R68_5.2@2088.5,1024.18 2120,992.69 2120,975.43 2102.16,957.59 2102.16,902.02 2145,859.18 IC2_5.2@2194.9,859.18
NetIC2_6_2: IC2_6.2 R67_6.1 R68_6.2 | length 310.1
  TopLayer w6: R67_6.1@3007.87,925.76 R68_6.2@3064.88,925.76 3096.38,894.26 3096.38,877.01 3078.54,859.16 3078.54,803.6 3121.38,760.76 IC2_6.2@3171.28,760.76
NetIC2_7_2: IC2_7.2 R67_7.1 R68_7.2 | length 310.1
  TopLayer w6: R67_7.1@2031.5,1299.77 R68_7.2@2088.5,1299.77 2120,1268.28 2120,1251.02 2102.16,1233.18 2102.16,1177.61 2145,1134.77 IC2_7.2@2194.9,1134.77
NetIC2_8_2: IC2_8.2 R67_8.1 R68_8.2 | length 310.1
  TopLayer w6: R67_8.1@3007.87,1201.35 R68_8.2@3064.88,1201.35 3096.38,1169.85 3096.38,1152.6 3078.54,1134.76 3078.54,1079.19 3121.38,1036.35 IC2_8.2@3171.28,1036.35
NetIC2_9_2: IC2_9.2 R67_9.1 R68_9.2 | length 310.1
  TopLayer w6: R67_9.1@3921.26,1211.19 R68_9.2@3978.27,1211.19 4009.76,1179.69 4009.76,1162.44 3991.92,1144.6 3991.92,1089.03 4034.76,1046.19 IC2_9.2@4084.67,1046.19
NetIC2_10_2: IC2_10.2 R67_10.1 R68_10.2 | length 310.1
  TopLayer w6: R67_10.1@2031.5,1575.36 R68_10.2@2088.5,1575.36 2120,1543.87 2120,1526.61 2102.16,1508.77 2102.16,1453.2 2145,1410.36 IC2_10.2@2194.9,1410.36
NetIC2_11_2: IC2_11.2 R67_11.1 R68_11.2 | length 310.1
  TopLayer w6: R67_11.1@3007.87,1476.94 R68_11.2@3064.88,1476.94 3096.38,1445.44 3096.38,1428.19 3078.54,1410.35 3078.54,1354.78 3121.38,1311.94 IC2_11.2@3171.28,1311.94
NetIC2_12_2: IC2_12.2 R67_12.1 R68_12.2 | length 310.1
  TopLayer w6: R67_12.1@3921.26,1486.78 R68_12.2@3978.27,1486.78 4009.76,1455.28 4009.76,1438.03 3991.92,1420.19 3991.92,1364.62 4034.76,1321.78 IC2_12.2@4084.67,1321.78
NetIC2_13_2: IC2_13.2 R67_13.1 R68_13.2 | length 310.1
  TopLayer w6: R67_13.1@2031.5,1850.95 R68_13.2@2088.5,1850.95 2120,1819.46 2120,1802.2 2102.16,1784.36 2102.16,1728.8 2145,1685.95 IC2_13.2@2194.9,1685.95
NetIC2_14_2: IC2_14.2 R67_14.1 R68_14.2 | length 310.1
  TopLayer w6: R67_14.1@3007.87,1752.53 R68_14.2@3064.88,1752.53 3096.38,1721.03 3096.38,1703.78 3078.54,1685.94 3078.54,1630.37 3121.38,1587.53 IC2_14.2@3171.28,1587.53
NetIC2_15_2: IC2_15.2 R67_15.1 R68_15.2 | length 310.1
  TopLayer w6: R67_15.1@3921.26,1762.37 R68_15.2@3978.27,1762.37 4009.76,1730.87 4009.76,1713.62 3991.92,1695.78 3991.92,1640.21 4034.76,1597.37 IC2_15.2@4084.67,1597.37
NetIC2_16_2: IC2_16.2 R67_16.1 R68_16.2 | length 310.1
  TopLayer w6: R67_16.1@2031.5,2126.54 R68_16.2@2088.5,2126.54 2120,2095.05 2120,2077.79 2102.16,2059.95 2102.16,2004.39 2145,1961.54 IC2_16.2@2194.9,1961.54
NetIC2_17_2: IC2_17.2 R67_17.1 R68_17.2 | length 310.1
  TopLayer w6: R67_17.1@3007.87,2028.12 R68_17.2@3064.88,2028.12 3096.38,1996.62 3096.38,1979.37 3078.54,1961.53 3078.54,1905.96 3121.38,1863.12 IC2_17.2@3171.28,1863.12
NetIC2_18_2: IC2_18.2 R67_18.1 R68_18.2 | length 310.1
  TopLayer w6: R67_18.1@3921.26,2037.96 R68_18.2@3978.27,2037.96 4009.76,2006.46 4009.76,1989.21 3991.92,1971.37 3991.92,1915.8 4034.76,1872.96 IC2_18.2@4084.67,1872.96
NetIC2_19_2: IC2_19.2 R67_19.1 R68_19.2 | length 310.1
  TopLayer w6: R67_19.1@2031.5,2402.13 R68_19.2@2088.5,2402.13 2120,2370.64 2120,2353.39 2102.16,2335.54 2102.16,2279.98 2145,2237.13 IC2_19.2@2194.9,2237.13
NetIC2_20_2: IC2_20.2 R67_20.1 R68_20.2 | length 310.1
  TopLayer w6: R67_20.1@3007.87,2303.71 R68_20.2@3064.88,2303.71 3096.38,2272.21 3096.38,2254.96 3078.54,2237.12 3078.54,2181.55 3121.38,2138.71 IC2_20.2@3171.28,2138.71
NetIC2_21_2: IC2_21.2 R67_21.1 R68_21.2 | length 310.1
  TopLayer w6: R67_21.1@3921.26,2313.55 R68_21.2@3978.27,2313.55 4009.76,2282.05 4009.76,2264.8 3991.92,2246.96 3991.92,2191.39 4034.76,2148.55 IC2_21.2@4084.67,2148.55
NetIC2_22_2: IC2_22.2 R67_22.1 R68_22.2 | length 310.1
  TopLayer w6: R67_22.1@2031.5,2677.72 R68_22.2@2088.5,2677.72 2120,2646.23 2120,2628.98 2102.16,2611.13 2102.16,2555.57 2145,2512.72 IC2_22.2@2194.9,2512.72
NetIC2_23_2: IC2_23.2 R67_23.1 R68_23.2 | length 310.1
  TopLayer w6: R67_23.1@3007.87,2579.3 R68_23.2@3064.88,2579.3 3096.38,2547.8 3096.38,2530.55 3078.54,2512.71 3078.54,2457.14 3121.38,2414.3 IC2_23.2@3171.28,2414.3
NetIC2_24_2: IC2_24.2 R67_24.1 R68_24.2 | length 310.1
  TopLayer w6: R67_24.1@3921.26,2589.14 R68_24.2@3978.27,2589.14 4009.76,2557.65 4009.76,2540.39 3991.92,2522.55 3991.92,2466.98 4034.76,2424.14 IC2_24.2@4084.67,2424.14
NetIC2_25_2: IC2_25.2 R67_25.1 R68_25.2 | length 310.1
  TopLayer w6: R67_25.1@2031.5,2953.32 R68_25.2@2088.5,2953.32 2120,2921.82 2120,2904.57 2102.16,2886.72 2102.16,2831.16 2145,2788.32 IC2_25.2@2194.9,2788.32
NetIC2_26_2: IC2_26.2 R67_26.1 R68_26.2 | length 310.1
  TopLayer w6: R67_26.1@3007.87,2854.89 R68_26.2@3064.88,2854.89 3096.38,2823.39 3096.38,2806.14 3078.54,2788.3 3078.54,2732.73 3121.38,2689.89 IC2_26.2@3171.28,2689.89
NetIC2_27_2: IC2_27.2 R67_27.1 R68_27.2 | length 310.1
  TopLayer w6: R67_27.1@3921.26,2864.73 R68_27.2@3978.27,2864.73 4009.76,2833.24 4009.76,2815.98 3991.92,2798.14 3991.92,2742.57 4034.76,2699.73 IC2_27.2@4084.67,2699.73
NetIC2_28_2: IC2_28.2 R67_28.1 R68_28.2 | length 310.1
  TopLayer w6: R67_28.1@2031.5,3228.91 R68_28.2@2088.5,3228.91 2120,3197.41 2120,3180.16 2102.16,3162.31 2102.16,3106.75 2145,3063.91 IC2_28.2@2194.9,3063.91
NetIC2_29_2: IC2_29.2 R67_29.1 R68_29.2 | length 310.1
  TopLayer w6: R67_29.1@3007.87,3130.48 R68_29.2@3064.88,3130.48 3096.38,3098.98 3096.38,3081.73 3078.54,3063.89 3078.54,3008.32 3121.38,2965.48 IC2_29.2@3171.28,2965.48
NetIC2_30_2: IC2_30.2 R67_30.1 R68_30.2 | length 310.1
  TopLayer w6: R67_30.1@3921.26,3140.32 R68_30.2@3978.27,3140.32 4009.76,3108.83 4009.76,3091.57 3991.92,3073.73 3991.92,3018.16 4034.76,2975.32 IC2_30.2@4084.67,2975.32
NetIC2_31_2: IC2_31.2 R67_31.1 R68_31.2 | length 310.1
  TopLayer w6: R67_31.1@3007.87,3406.07 R68_31.2@3064.88,3406.07 3096.38,3374.57 3096.38,3357.32 3078.54,3339.48 3078.54,3283.91 3121.38,3241.07 IC2_31.2@3171.28,3241.07
NetIC2_32_2: IC2_32.2 R67_32.1 R68_32.2 | length 310.1
  TopLayer w6: R67_32.1@3921.26,3415.91 R68_32.2@3978.27,3415.91 4009.76,3384.42 4009.76,3367.16 3991.92,3349.32 3991.92,3293.76 4034.76,3250.91 IC2_32.2@4084.67,3250.91
NetIC4_4: IC4.4 IC11.3 R69.1 R70.2 | length 517.3
  TopLayer w10: v1(4809.82,1514.57) 4811.11,1515.87 4839.82,1515.87 IC11.3@4839.9,1515.94
  TopLayer w20: R69.1@4573.84,1792.89 v1(4586.79,1792.89) IC4.4@4623.84,1792.89
  TopLayer w30: R69.1@4557.73,1787.26 R70.2@4557.73,1842.06
  Signal Layer 1 w10: v1(4586.79,1792.89) 4588.64,1791.04 4607.54,1791.04 4809.96,1588.62 4809.96,1514.71 v1(4809.82,1514.57)
NetIC6_10: IC6.10 R26.1 R27.2 | length 256.8
  TopLayer w10: R27.2@5137.26,3414.64 v1(5170.28,3414.64) 5203.3,3414.64 R26.1@5203.79,3414.15
  BottomLayer w10: IC6.10@5134.92,3239.25 5134.92,3379.28 v1(5170.28,3414.64)
NetIC7_4: IC7.4 R33.1 R34.2 | length 221.4
  TopLayer w10: R34.2@4991.89,1988.61 4991.67,1988.4 4954.7,1988.4 R33.1@4954.49,1988.18 4954.49,2036.94 4989.92,2072.37 4989.92,2108.22 4996.78,2115.08 IC7.4@5036.22,2115.08
NetIC8_1: IC8.1 IC8.40 R16.2 | length 486.8
  TopLayer w8: v1(5317.9,1528.29) IC8.1@5354.32,1528.29 ; v1(5486.15,1642.89) 5494.75,1634.29 R16.2@5522.46,1634.29 5539.36,1617.39 IC8.40@5539.36,1555.85
  Signal Layer 1 w8: v1(5317.9,1528.29) 5315.26,1530.93 5315.26,1656.27 5338.88,1679.89 5449.15,1679.89 v1(5486.15,1642.89)
NetIC8_5: IC8.5 IC8.42 R17.2 | length 625.4
  TopLayer w5: IC8.5@5354.32,1449.55 5353.66,1448.89 5316.5,1448.89 5290.04,1422.43 5262.73,1422.43 5262.73,1519.38 5315.26,1571.91 5315.26,1656.27 5330.3,1671.3 5432.74,1671.3 5499.99,1604.05 IC8.42@5499.99,1555.85
NetIC8_8: IC8.8 IC8.19 R18.2 | length 417.6
  TopLayer w5: v1(5308.15,1408.89) 5326.54,1390.5 IC8.8@5354.32,1390.5 ; v1(5463.15,1223.89) 5497.05,1223.89 5499.99,1226.83 IC8.19@5499.99,1284.2
  Signal Layer 1 w5: v1(5308.15,1408.89) 5308.15,1367.75 5408.66,1267.23 5441.33,1267.23 5451.49,1257.07 5451.49,1235.55 v1(5463.15,1223.89)
NetIC8_12: IC8.12 IC8.21 R19.2 | length 371.5
  TopLayer w10: R19.2@5303.97,1258.8 v1(5335.05,1258.8) 5354.32,1278.06 IC8.12@5354.32,1311.76 ; v1(5538.15,1250.89) 5538.15,1280.98 5537.15,1281.98 IC8.21@5539.36,1284.2
  Signal Layer 1 w5: v1(5335.05,1258.8) 5357.96,1235.89 5423.62,1235.89 5452.96,1206.55 5470.33,1206.55 5514.67,1250.89 v1(5538.15,1250.89)
  Signal Layer 1 w10: v1@5538.15,1249.17 v1(5538.15,1250.89)
NetIC8_20: IC8.20 IC8.22 IC8.39 IC8.41 R6.1 | length 1353.7
  TopLayer w5: IC8.39@5559.05,1555.85 5559.05,1620.79 5559.15,1620.89 v1(5562.15,1620.89)
  TopLayer w8: IC8.20@5519.68,1284.2 5519.68,1308.42 5528.15,1316.89 5552.15,1316.89 5559.05,1309.99 IC8.22@5559.05,1284.2 5559.05,1227.49 5548.45,1216.89 v1(5530.15,1216.89) ; IC8.41@5519.68,1555.85 5519.68,1525.36 5527.15,1517.89 5551.15,1517.89 5559.05,1525.79 IC8.39@5559.05,1555.85
  Signal Layer 1 w5: v1(5530.15,1216.89) 5545.15,1216.89 5562.15,1233.89 5562.15,1254.95 5532.9,1284.2 5405.84,1284.2 5358.15,1331.89 5358.15,1437.48 5346.74,1448.89 5306.69,1448.89 5296.53,1459.05 5296.53,1671 5324.41,1698.89 5466.65,1698.89 5544.65,1620.89 v1(5562.15,1620.89)
NetIC8_26: IC8.26 R97.2 | length 615.6
  TopLayer w5: R97.2@5258.65,1209.89 5317.15,1209.89 5340.37,1186.67 5375.62,1186.67 5382.06,1180.23 5395,1180.23 5395.51,1180.74 5434.73,1180.74 5438.57,1176.89 5533.19,1176.89 5534.29,1175.79 5652.05,1175.79 5675.15,1198.89 5675.15,1319.89 5663.6,1331.44 IC8.26@5625.97,1331.44
NetIC8_28: IC8.28 R14.2 | length 669.7
  TopLayer w5: R14.2@5259.65,1169.89 5307.15,1169.89 5311.15,1165.89 5368.34,1165.89 5372.68,1170.23 5399.15,1170.23 5399.65,1170.74 5430.59,1170.74 5435.43,1165.89 5530.05,1165.89 5530.14,1165.79 5662.05,1165.79 5690.15,1193.89 5690.15,1337.89 5657.23,1370.81 IC8.28@5625.97,1370.81
NetIC8_33: IC8.33 R13.2 | length 423.3
  TopLayer w5: R13.2@5483.98,1721.98 5595.06,1721.98 5667.15,1649.89 5667.15,1488.89 5647.49,1469.24 IC8.33@5625.97,1469.24
NetIC8_36: IC8.36 R11.2 | length 347.3
  TopLayer w5: R11.2@5406.65,1698.89 5553.15,1698.89 5625.97,1626.06 IC8.36@5625.97,1528.29
NetIC9_1: IC9.1 IC9.40 R20.2 | length 427
  TopLayer w5: R20.2@5331.15,1061.39 5345.93,1061.39 v1(5363.15,1044.17) 5364.72,1042.59 IC9.1@5364.72,1014.64 ; v1@5539.9,1085.64 5549.76,1075.77 IC9.40@5549.76,1042.2
  Signal Layer 1 w5: v1(5363.15,1044.17) 5363.15,1141.86 5381.52,1160.23 5421.57,1160.23 5424.53,1157.27 5500.92,1080.89 v1(5535.15,1080.89)
NetIC9_5: IC9.5 IC9.42 R21.2 | length 446.8
  TopLayer w5: R21.2@5493.65,1109.89 5493.65,1094.88 5510.39,1078.14 IC9.42@5510.39,1042.2 5510.39,1017.65 v1(5521.15,1006.89)
  TopLayer w10: v1(5332.91,906.87) 5337.01,910.97 5337.01,922.8 5346.32,932.12 5360.94,932.12 IC9.5@5364.72,935.9
  Signal Layer 1 w5: v1(5332.91,906.87) 5332.91,977.28 5375.52,1019.89 5411.18,1019.89 5424.18,1006.89 v1(5521.15,1006.89)
NetIC9_8: IC9.8 IC9.19 R22.2 | length 292
  TopLayer w5: R22.2@5306.65,905.89 5335.7,876.84 IC9.8@5364.72,876.84 5365.38,877.5 5386.76,877.5 v1(5400.15,890.89) ; v1(5510.15,805.89) 5510.15,770.79 IC9.19@5510.39,770.54
  Signal Layer 1 w5: v1(5400.15,890.89) 5415.52,890.89 5429.35,877.06 5439.06,877.06 5510.15,805.97 v1(5510.15,805.89)
NetIC9_12: IC9.12 IC9.21 R23.2 | length 350.7
  TopLayer w15: v1(5361.15,753.89) 5364.72,757.46 IC9.12@5364.72,798.1 ; v1(5513.15,680.89) 5525.76,680.89 5543.17,698.3 R23.2@5547.46,698.3 5549.76,700.6 IC9.21@5549.76,770.54
  Signal Layer 1 w5: v1(5361.15,753.89) 5453.84,753.89 5468.66,739.07 5468.66,725.38 v1(5513.15,680.89)
NetIC9_20: IC9.20 IC9.22 IC9.39 IC9.41 R157.1 R171.1 | length 1099.5
  TopLayer w5: IC9.20@5530.08,770.54 5530.08,802.82 5533.15,805.89 5562.15,805.89 5569.45,798.59 IC9.22@5569.45,770.54 5569.45,740.59 5585.46,724.57 R157.1@5585.46,698.3 5601.05,713.89 v1(5640.15,713.89) ; IC9.41@5530.08,1042.2 5530.08,1022.49 5538.49,1014.07 5538.49,1011.55 v1(5567.81,1011.55) 5570.15,1013.89 5570.15,1091.38 R171.1@5566.15,1095.39
  Signal Layer 1 w5: v1(5567.81,1011.55) 5545.81,989.55 5427.38,989.55 5412.13,1004.8 5392.05,1004.8 5364.72,977.46 5364.72,955.83 5433.5,887.06 5600.98,887.06 5640.15,847.89 v1(5640.15,713.89)
NetIC9_26: IC9.26 R88.2 | length 638.2
  TopLayer w5: R88.2@5311.58,767.25 5324.29,754.54 5324.29,739.89 5372.36,691.82 5372.36,680.71 5391.28,661.79 5434.25,661.79 5462.99,633.05 5634.31,633.05 5683.15,681.89 5683.15,805.89 5671.25,817.79 IC9.26@5636.38,817.79
NetIC9_28: IC9.28 R51.2 TP14.1 | length 1919.3
  TopLayer w5: v1(5213.35,672.76) 5366.16,672.76 5389.04,649.89 5418.55,649.89 5491.15,577.29 TP14.1@5577.52,577.29 5654.29,577.29 5702.15,625.15 5702.15,842.89 5687.88,857.16 IC9.28@5636.38,857.16
  BottomLayer w5: R51.2@4299.76,294.81 4331.59,294.81 4396.92,360.15 4590.69,360.15 4761.57,531.03 4761.57,550.72 4883.62,672.76 v1(5213.35,672.76)
NetIC9_33: IC9.33 R101.2 | length 639.5
  TopLayer w5: R101.2@5259.65,1131.89 5289.25,1131.89 5313.15,1155.79 5372.38,1155.79 5376.82,1160.23 5403.29,1160.23 5403.79,1160.74 5426.44,1160.74 5431.39,1155.79 5632.25,1155.79 5677.15,1110.89 5677.15,966.89 5665.84,955.58 IC9.33@5636.38,955.58
NetIC9_36: IC9.36 R99.2 | length 521.8
  TopLayer w5: R99.2@5259.65,1093.89 5272.84,1093.89 5312.81,1133.86 5312.81,1135.07 5323.52,1145.79 5376.52,1145.79 5380.96,1150.23 5407.43,1150.23 5407.93,1150.74 5422.3,1150.74 5427.25,1145.79 5615.25,1145.79 5636.38,1124.66 IC9.36@5636.38,1014.64
NetIC12_1: IC12.1 R43.1 R44.2 | length 192.4
  TopLayer w10: IC12.1@5071.55,1515.61 5071.04,1515.1 5071.04,1391.48 5071.51,1391 5081.9,1401.39 5123.01,1401.39 R44.2@5131.23,1409.61
NetIC12_3: IC12.3 R37.1 | length 90.8
  TopLayer w10: IC12.3@5110.92,1513.64 5111.11,1513.46 5111.11,1479.13 5123.71,1466.52 R37.1@5162.09,1466.52
NetIC13_1: IC13.1 R38.1 R40.2 | length 146.2
  BottomLayer w10: IC13.1@5086.81,1632.64 5086.32,1633.14 5089.56,1633.14 5089.57,1647.28 5122.15,1679.86 5122.15,1703.7 R40.2@5130.54,1712.1
  BottomLayer w15: R40.2@5130.06,1712.58 5130.54,1712.1 5175.48,1712.1 R38.1@5175.96,1711.62
NetIC13_3: IC13.3 R41.1 | length 65.9
  BottomLayer w10: IC13.3@5085.59,1592.76 5086.1,1593.27 IC13.3@5088.78,1593.27 5089.29,1592.76 5109.54,1592.76 5115.4,1586.9 5115.4,1562.37 R41.1@5109.22,1556.18
NetIC17_7: IC17.7 R83.1 | length 146.4
  BottomLayer w6: R83.1@-61.02,1460.63 -94.49,1460.63 -101.61,1453.51 -101.61,1408.69 -85.63,1392.72 IC17.7@-50.2,1392.72
NetIC17_9: IC17.9 R81.1 | length 79.1
  BottomLayer w6: IC17.9@182.09,1418.31 232.28,1418.31 252.17,1438.19 R81.1@252.17,1438.98
NetIC17_10: IC17.10 R80.1 | length 74.6
  BottomLayer w6: IC17.10@182.09,1392.72 243.11,1392.72 252.17,1401.77 R80.1@252.17,1402.56
NetIC17_11: IC17.11 R79.1 | length 70.9
  BottomLayer w6: IC17.11@182.09,1367.13 250.2,1367.13 R79.1@252.17,1365.16
NetIC17_12: IC17.12 R78.1 | length 75.8
  BottomLayer w6: IC17.12@182.09,1341.54 187.94,1335.68 214.49,1335.68 219.07,1331.1 248.82,1331.1 R78.1@252.17,1327.76
NetIC17_13: IC17.13 R77.1 | length 81.1
  BottomLayer w6: IC17.13@182.09,1315.94 227.36,1315.94 252.17,1291.14 R77.1@252.17,1290.35
NetIC17_14: IC17.14 R29.1 | length 86
  BottomLayer w6: IC17.14@182.09,1290.35 187.15,1285.29 220.61,1285.29 252.17,1253.74 R29.1@252.17,1252.95
NetIC17_15: IC17.15 R28.1 | length 92.4
  BottomLayer w6: IC17.15@182.09,1264.76 202.76,1264.76 211.49,1256.03 214.93,1256.03 229.34,1241.62 229.34,1239.17 252.17,1216.34 R28.1@252.17,1215.55
NetIC20_3: IC20.3 R94.1 | length 75.4
  BottomLayer w5: R94.1@-31.5,2382.09 -30.51,2381.1 IC20.3@-30.51,2307.09
NetIC20_5: IC20.5 R93.1 | length 75
  BottomLayer w5: IC20.5@20.67,2307.09 R93.1@20.67,2382.09
NetIC20_7: IC20.7 R92.1 | length 78.8
  BottomLayer w5: IC20.7@71.85,2307.09 71.85,2368.11 83.86,2380.12 R92.1@84.65,2380.12
NetIC20_9: IC20.9 R90.1 | length 73.4
  BottomLayer w5: R90.1@122.05,2380.12 123.03,2379.13 IC20.9@123.03,2307.09
NetIC20_12: IC20.12 R89.1 | length 70.3
  BottomLayer w5: IC20.12@123.03,2074.8 123.03,2005.91 R89.1@124.02,2004.92
NetIC20_14: IC20.14 R87.1 | length 70.5
  BottomLayer w5: R87.1@70.87,2004.72 71.85,2005.71 IC20.14@71.85,2074.8
NetIC20_16: IC20.16 R86.1 | length 71.3
  BottomLayer w5: R86.1@17.72,2004.72 20.67,2007.68 IC20.16@20.67,2074.8
NetIC20_18: IC20.18 R85.1 | length 70.5
  BottomLayer w5: IC20.18@-30.51,2074.8 -30.51,2005.71 R85.1@-29.53,2004.72
NetIC21_3: IC21.3 R91.1 | length 63
  BottomLayer w5: IC21.3@179.13,1627.95 181.1,1625.98 R91.1@241.34,1625.98
NetIC22_1: IC22.1 IC22.40 R96.2 | length 280.7
  TopLayer w5: IC22.1@7364.17,1966.54 v1(7364.17,1986.22) ; R96.2@7535.43,2048.43 7536.22,2048.43 7549.21,2035.43 v1(7549.21,2023.62) IC22.40@7549.21,1994.09
  BottomLayer w5: v1(7364.17,1986.22) 7511.81,1986.22 v1(7549.21,2023.62)
NetIC22_5: IC22.5 IC22.42 R102.2 | length 291.7
  TopLayer w5: IC22.5@7364.17,1887.8 7391.73,1887.8 7401.57,1897.64 7401.57,1944.88 7413.39,1956.69 7496.06,1956.69 7509.84,1970.47 IC22.42@7509.84,1994.09 7509.84,2035.43 7496.85,2048.43 R102.2@7496.06,2048.43
NetIC22_8: IC22.8 IC22.19 R105.2 | length 429
  TopLayer w5: v1(7318.9,1842.52) 7338.58,1842.52 7352.36,1828.74 IC22.8@7364.17,1828.74 ; IC22.19@7509.84,1722.44 7509.84,1694.29 7509.86,1666.16 R105.2@7511.81,1664.17
  BottomLayer w5: v1(7318.9,1842.52) 7316.35,1839.97 7316.35,1776.98 7314.96,1775.59 7314.96,1763.15 7313.66,1761.85 7313.66,1741.46 7338.58,1716.54 7487.62,1716.54 v1(7509.86,1694.29)
NetIC22_12: IC22.12 IC22.21 R108.2 | length 291.7
  TopLayer w5: R108.2@7309.84,1696.85 7309.84,1697.64 7318.76,1706.56 7332.54,1706.56 7364.17,1738.19 IC22.12@7364.17,1750 7541.34,1750 7547.91,1743.43 7547.91,1723.74 IC22.21@7549.21,1722.44
NetIC22_20: IC22.20 IC22.22 IC22.39 IC22.41 R95.1 | length 535.9
  TopLayer w5: IC22.20@7529.53,1722.44 7529.53,1690.94 7539.37,1681.1 7559.06,1681.1 7568.9,1690.94 IC22.22@7568.9,1722.44 7568.9,1746.06 7594.49,1771.65 7594.49,1944.3 7590.34,1948.44 7585.78,1948.44 7577.52,1948.44 7568.58,1957.38 7568.58,1993.78 IC22.39@7568.9,1994.09 7568.9,2042.52 R95.1@7574.8,2048.43 ; IC22.41@7529.53,1994.09 7529.53,1970.47 7542.32,1957.68 7568.58,1957.68
NetIC22_26: IC22.26 R110.2 | length 67.7
  TopLayer w5: IC22.26@7635.83,1769.69 7673.23,1769.69 7694.09,1748.82 R110.2@7694.09,1748.03
NetIC22_28: IC22.28 R107.2 | length 59.1
  TopLayer w5: IC22.28@7635.83,1809.06 7692.13,1809.06 R107.2@7694.09,1811.02
NetIC22_33: IC22.33 R104.2 | length 59.2
  TopLayer w10: IC22.33@7635.83,1907.48 7635.98,1907.32 7691.97,1907.32 R104.2@7694.09,1909.45